# EAGLE board two_resistors (EAGLE 9.6.2)
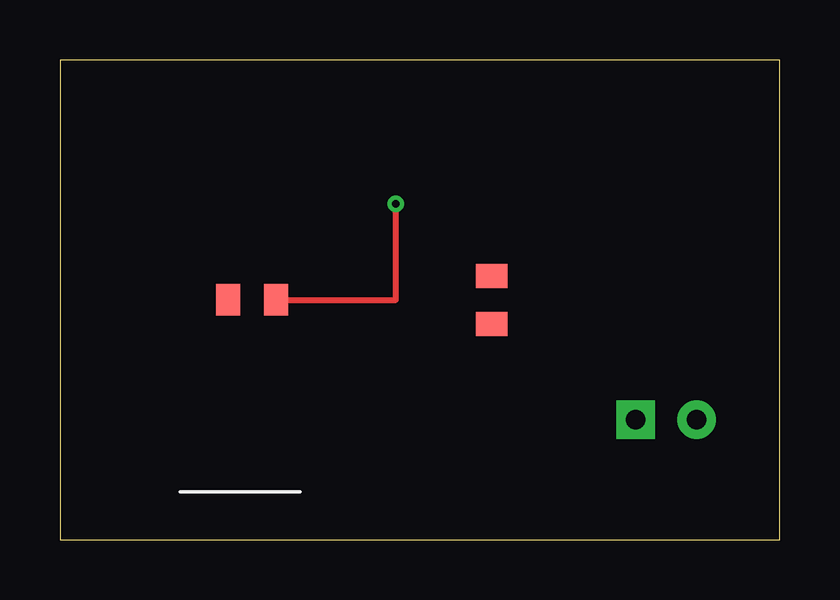
[diagram p0: board, top side]
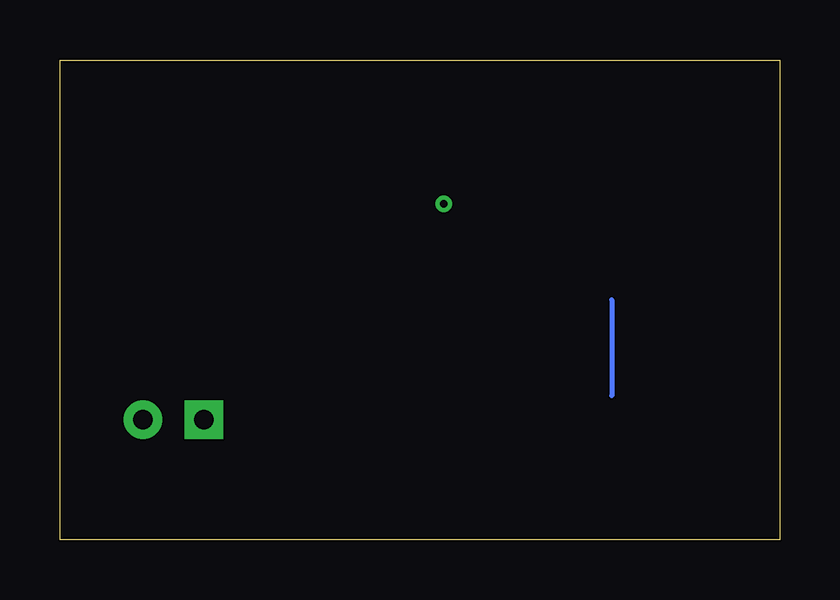
[diagram p1: board, bottom side, seen from below]

Size 30 x 20 mm. Coordinates in mm from the lower left corner, seen from the top.
Outline: 0,0 30,0 30,20 0,20 0,0
Copper layers used: Top, Bottom

## Footprints (pad centres in the part's own frame; a part is rotated, then mirrored left to right if it is on the bottom)
PIN2 = drill 0.8 pad 1.6 square: 1 0,0 | drill 0.8 pad 1.6 round: 2 2.54,0
R0805 = smd 1 x 1.3: 1 -1,0; 2 1,0

## Placement (x,y rotation side)
J1  HDR  [PIN2]  24,5 0 top
R1  10k  [R0805]  8,10 0 top
R2  4k7  [R0805]  18,10 90 top

## Library data of the parts
J1 R1 R2 = hand

## Nets
GND: J1.1 R1.2
SIG: R1.1 R2.1

## Tracks (layer width: path | path; a pad name or v marks a point on that pad's centre or on a via)
GND  (via drill 0.3 pad 0.6)
  Top 0.25: R1.2 14,10 v14,14
SIG
  Bottom 0.2: R1.1 7,6